# Altium PCB Mega2560_Custom.PcbDoc (part 5 of 6)
Units mil, origin at the board's own origin, x right, y up, seen from the top; angles counter-clockwise.
Board outline 4742.41 x 2889.95 mil, 2 copper layers (Top Layer, Bottom Layer), stack 57 mil thick; 215 components, 134 nets, 793 pads, 779 vias.
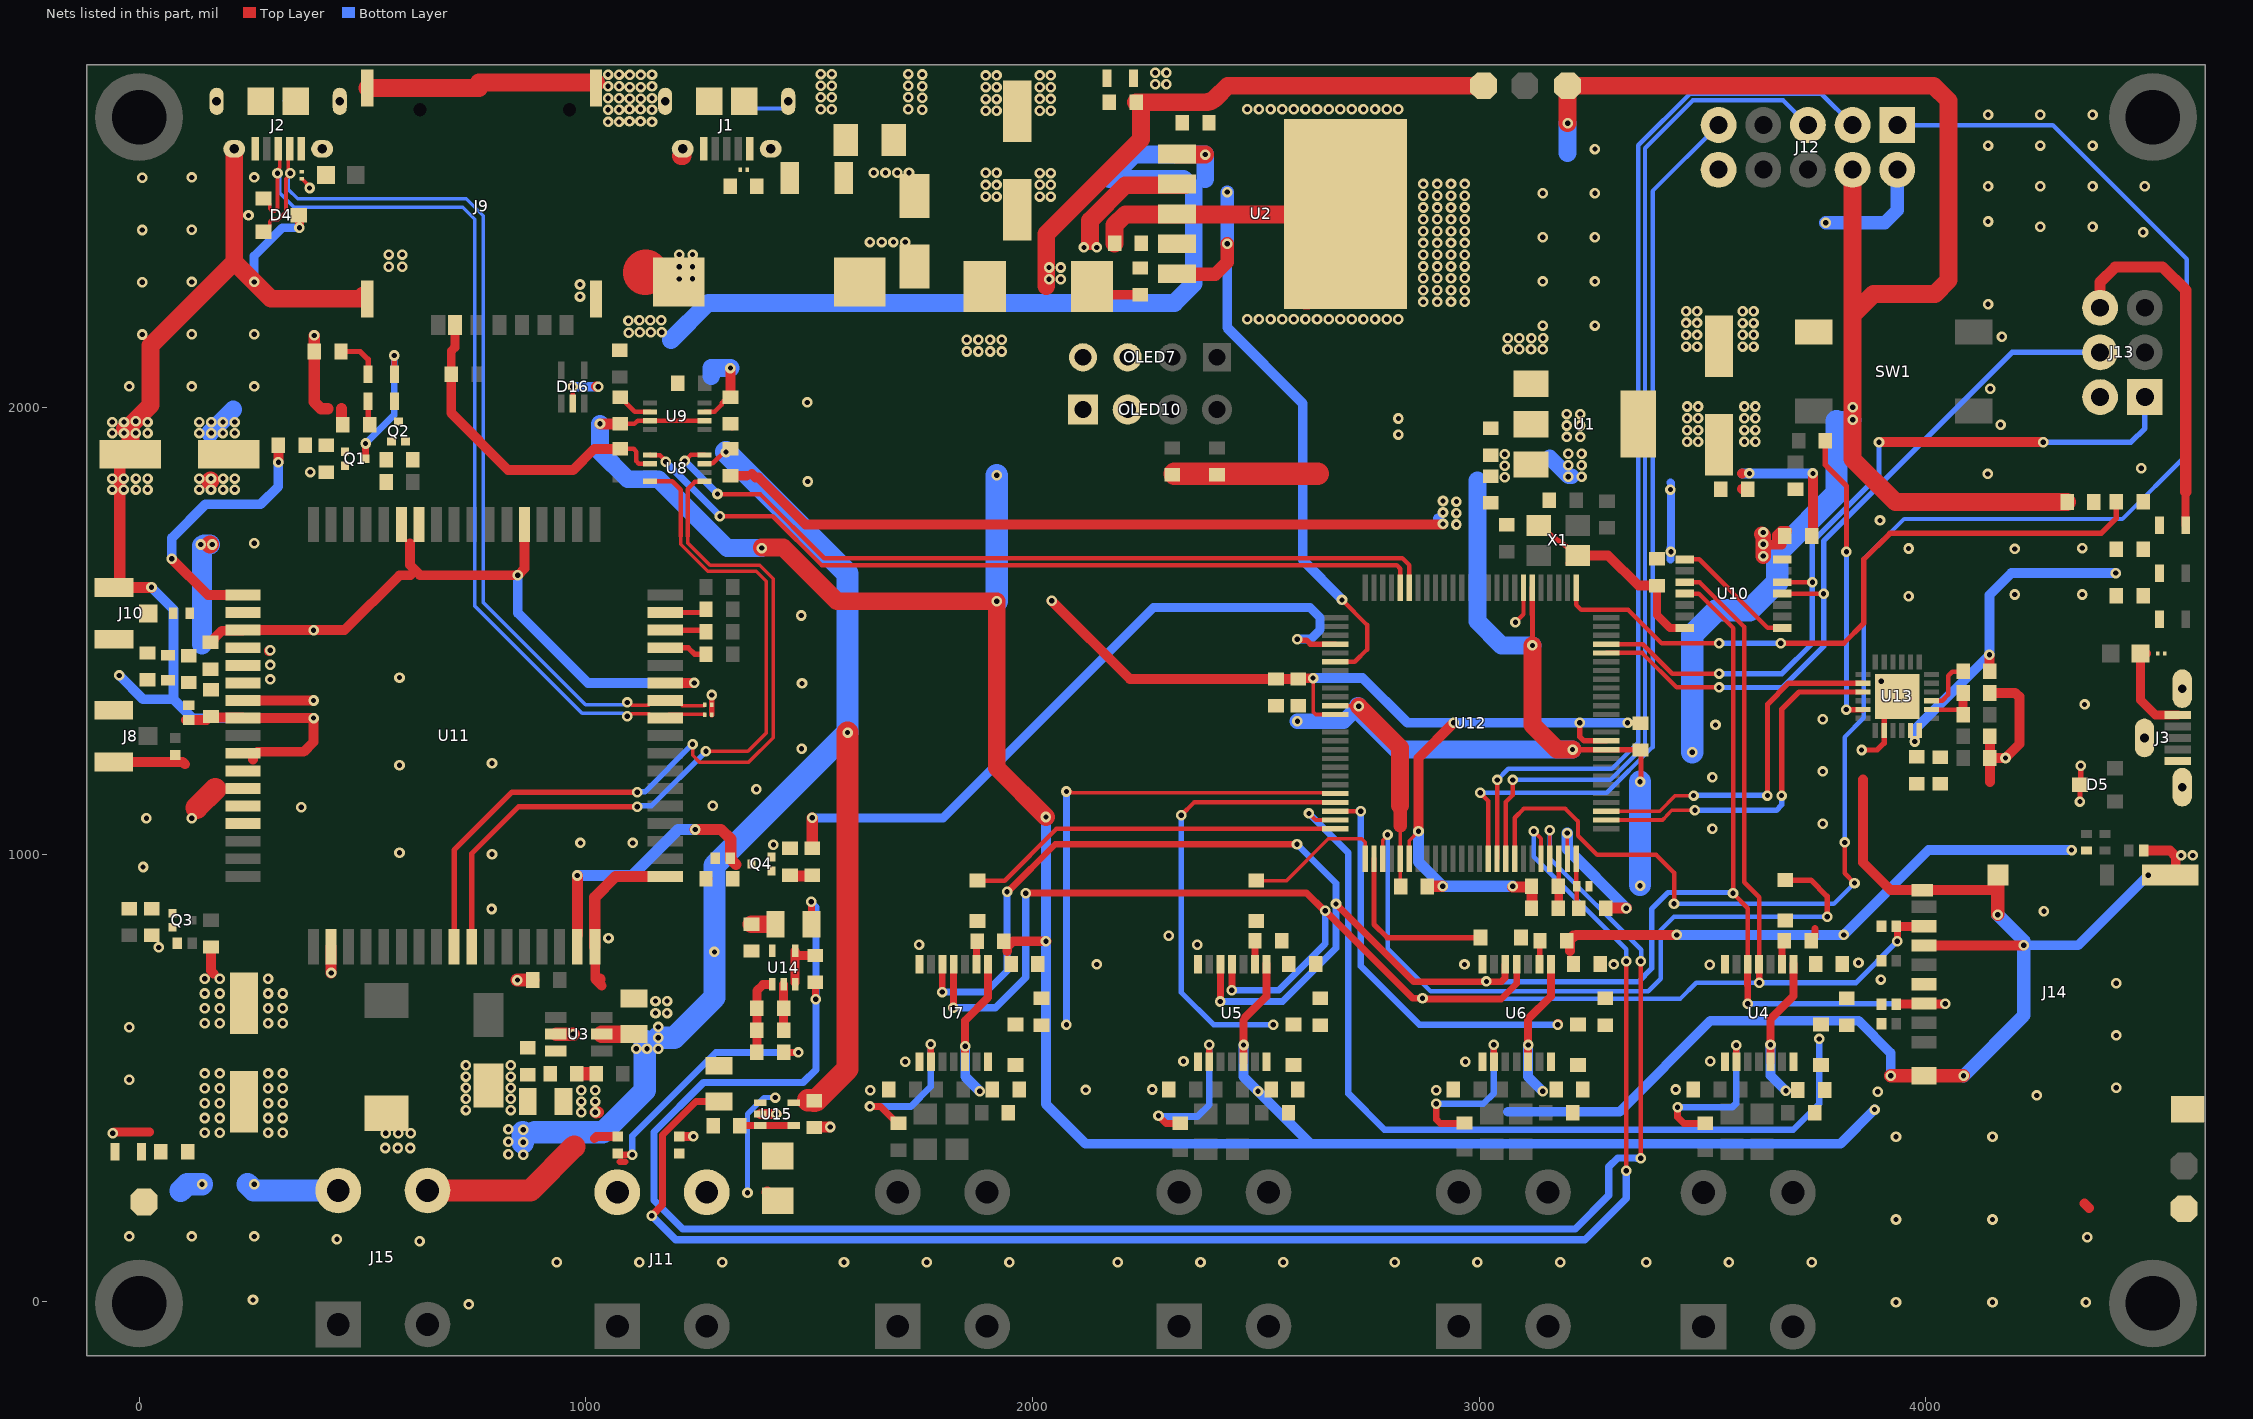
[diagram p2: the nets of this part, all layers, seen from the top]

## Via types
v1: diameter 23.62, hole 11.81, Top Layer to Bottom Layer, 779 vias

## Nets (pads, with @x,y where several pads share a name; then routed paths per layer and width w, separated by ;. In a path a pad name is that pad's centre, name@x,y a point inside that pad or via, vN(x,y) a via of type N, cw(c..) or ccw(c..) an arc to the next point about the centre after c; other vN are vias at no path point) (continued)
GND: (continued)
  Top Layer w22: J8.3@-43.53,1206.88 97.89,1206.88 102.82,1201.95 ; D21.2@105,1301 105.17,1301.17 150.67,1301.17 158.5,1309 C37.2@161,1309 163.44,1306.56 231.62,1306.56 U11.59@232.82,1305.36 v1(390.56,1305.36) 390.56,1251.69 368.82,1229.95 264.82,1229.95 254.82,1219.95 254.82,1212.95 ; C38.2@160,1475 162.5,1475 166.5,1479 166.5,1482.08 185.43,1501 231.62,1501 U11.54@232.82,1502.21 v1(390.56,1502.21) 460.21,1502.21 582.95,1624.95 606.82,1624.95 607.82,1625.95 ; C41.1@161,793 161,740 167,734 ; U11.58@232.82,1344.73 v1(390.56,1344.73) ; 606.82,1696.45 606.82,1647.95 628.82,1625.95 ; 628.82,1624.95 v1(847.82,1624.95) 862.74,1639.87 U11.39@862.74,1738.43 ; C34.1@698.82,2074.95 698.82,1987.95 825.77,1861 971.87,1861 1018.82,1907.95 C29.2@1076.82,1907.95 ; U11.17@1020.22,793.55 1021.01,792.76 1021.01,721.18 1035.82,706.37 ; v1@1022.88,2047.7 v1@1023.19,2047.39 ; U11.29@1177.7,1384.1 v1(1242.67,1384.1) ; C40.1@1269,942 C40.1@1272.88,945.88 ; C54.2@1323.82,1847.95 1359.82,1847.95 ; C33.2@1323.82,1963.95 C33.2@1327.82,1959.95 ; 1372.05,1852 1380.05,1844 1387,1844 1492,1739 v1@2919,1739 ; U15.2@1390.6,419 v1(1426.6,419) ; v1(2042.82,1567.95) 2217.82,1392.95 C61.1@2545,1392.95 C45.2@2595,1392.95 ; C45.2@2598,1390 C45.2@2595,1392.95 C45.2@2595,1392.95 ; v1(2628,1395) 2627.69,1394.69 2596.74,1394.69 C45.2@2595,1392.95 ; v1(2864,1052) 2864,1216 v1(2943,1295) ; X1.4@3220.13,1669.48 3288.52,1669.48 3356.17,1601.83 C30.2@3397.94,1601.83 ; C7.1@3587.82,1817.95 C7.1@3588.51,1818.64 ; 3588.51,1852.64 3588.82,1852.95 ; C31.2@3744,1713 3747,1716 v1@3747,1852.2 ; 3858.82,1167.95 3858.82,982.18 3920.7,920.3 J14.SW-B@3991.58,920.3 4160.87,920.3 4164.48,920.3 ; J14.6@3995.52,796.28 4217.84,796.28 4218.56,797 v1(4219,797) ; 4143,1162 C50.2@4143,1216 ; C49.2@4143,1264.5 C50.2@4143,1216 ; R43.2@4143,1361.5 4199.93,1361.5 4207.48,1353.95 4209.45,1353.95 4209.45,1247.45 v1(4178,1216) ; v1@4173,1216 C50.2@4143,1216 ; D29.2@4487.73,1009 4546.11,1009 4559,996.11 4559,966.06 J14.S3@4546.7,953.76 v1(4497.76,953.76)
  Top Layer w25: C36.2@-43.18,1883 -43.18,1598.02 v1(27.89,1598.02) ; J2.MH2@210.28,2566.4 J2.MH2@213.03,2563.65 ; U11.2@429.67,793.55 429.97,793.25 v1@429.97,735.03 ; J9.2@509.79,2250.95 J9.2@509.79,2271 ; R30.2@613,1884 R30.2@614,1885 ; J9.C5@707.13,2185.45 J9.C5@708.81,2187.13 ; U11.17@1020.22,793.55 1020.22,904.35 1066.9,951.03 U11.18@1177.7,951.03 ; v1@1022.5,421.5 v1(1021,423) v1@1028,423 ; 1029.32,718.45 1031.82,720.95 ; Cx2.2@1511,389 1512,390 v1(1547,390) ; C46.2@2884,928.5 2884.5,929 v1(2918,929) ; v1@3075,927 3115.5,927 C48.2@3118,924.5 ; C62.2@3118,875 C48.2@3118,924.5 ; C48.2@3118,929 C48.2@3118,924.5 ; C60.2@3283,880 v1(3329,880) ; J13.6@4389.82,2223.95 4389.82,2280.95 4423.82,2314.95 4529.82,2314.95 4581.53,2263.24 4581.53,1812
  Top Layer w30: v1(847,719) C35.1@881.48,719 ; U3.2@933.43,598 v1(972,598) ; R5.1@980,509 R3.1@1023,509 ; v1(3921,505) 3921.06,504.94 J14.S1@3995.52,504.94 v1@4083.22,504.94 ; v1@4160.87,866.06 4160.87,920.3 J14.S2@4160.87,953.76
  Top Layer w40: v1@-32,1953 -26.92,1953 26,2005.92 26,2139.43 213.03,2326.46 ; C36.2@-19.24,1896 -19.24,1953 ; C36.2@17.82,1889.82 C36.2@19.82,1887.82 ; J2.MH2@213.03,2563.65 213.03,2326.46 ; J9.2@501.91,2250.95 494.96,2244 295.49,2244 v1(257.77,2281.72) 213.03,2326.46 ; J9.3@511.07,2716.16 761.32,2716.16 ; 761.32,2728.45 J9.4@1022.88,2728.45 ; J1.MH2@1212.74,2563.65 J1.MH2@1217.03,2563.65 ; C56.2@1371,844 Cx4.1@1424,844 ; C4.2@1965.82,2664.18 C4.2@1967.82,2666.18 ; R2.1@2183.82,2367.95 2183.82,2408.95 2207.82,2432.95 U2.6@2700.82,2432.95
  Top Layer w50: 129,1104.63 170.32,1145.95 ; J15.4@645.82,247.95 875.82,247.95 974,346.13
  Top Layer w100: U2.6@2613.22,2270.35 2700.82,2357.95 U2.6@2700.82,2432.95
  Bottom Layer w8: 325,2687.75 333.25,2696 ; J2.MH3@439.2,2696 J2.MH3@449.25,2685.95 ; 1366.63,2663.76 1372.82,2669.95 J1.MH3@1453.25,2669.95
  Bottom Layer w16: J3.SH1@4573.67,1356.92 J3.SH1@4573.67,1371.18
  Bottom Layer w20: v1(257.77,2281.72) 257.77,2339.77 321,2403 v1(359,2403)
  Bottom Layer w22: v1(-44.18,1400.95) 9.13,1347.64 77.36,1347.64 ; v1(27.89,1598.02) 77.36,1548.56 77.36,1347.64 ; v1(390.56,1305.36) 390.15,1304.95 120.05,1304.95 77.36,1347.64 ; v1@847.82,1625.51 v1(847.82,1624.95) 847.82,1540.95 1004.67,1384.1 v1(1242.67,1384.1) ; v1(971,2046.95) v1(1027.88,2046.95) ; v1(2628,1395) 2739,1395 2839,1295 v1(2943,1295) ; 2907,1752 2918.82,1740.18 v1(2918.82,1739.95) ; v1@2944.82,1294.95 v1(3224.82,1294.95) v1(3331.95,1294.95) ; 3064,424 3314,424 3518,628 3849,628 3921,556 v1(3921,505) v1@3921,504.94 ; 3588.82,1852.95 v1(3604.82,1852.95) v1(3747,1852.95) ; v1(4219,797) 4341,797 4497.23,953.23 4497.78,953.23 v1@4498,953.01
  Bottom Layer w25: v1(2864,1052) 2864,983 v1(2918,929) v1(3075,929) ; v1(3197,1048) 3197,1012 v1(3329,880)
  Bottom Layer w30: v1(3775.82,2413.95) 3907.82,2413.95 3935.82,2441.95 J12.2@3935.82,2532.95 ; v1(4084.21,504.94) 4219,639.73 v1(4219,797) 4219,806.94 v1(4160.87,865.07)
  other v1: 738.05,-7.23 3932.95,-2.23 4148.95,-2.23 4358,-2.23 255,3 935,87 1120,87 1305.23,87 1578,87 1763,87 1948.23,87 2191,87 2376,87 2561.23,87 2811,87 2996,87 3181.23,87 3374,87 3559,87 3744.23,87 628,134 443,139 4360.77,143.05 -22.23,145.05 117.77,145.05 257.77,145.05 3932.95,183 4148.95,183 3932.95,368 4148.95,368 990,423 990,447 1021,447 4248.05,460.77 3892,469 990,472 1021,472 1637,472 2904,472 2119,473 2268,474 3440,474 4426,478 -22.23,496.05 1715,536 2969,536 2338,537 3517,537 4426,595 -22.23,613.05 147.35,622.42 180.35,622.42 288.82,622.42 321.35,622.42 1156,645 1182,645 147.35,655.67 180.35,655.67 288.82,655.67 321.35,655.67 1156,672 1182,672 147.35,688.92 180.35,688.92 288.82,688.92 321.35,688.92 4426,712 3899.22,720.1 147.35,722.17 180.35,722.17 288.82,722.17 430,735 3516,753 2144,754 2967,754 3301,754 3849,758 44,792 1746,798 2369,798 1050.82,812.95 2305,818 4264,873 789,878 9,972 4571,998 4597,998 790.02,1000.88 583,1004 1420,1022 988,1026 1105,1026 3522,1057.81 3769,1069 16.58,1081.42 117.77,1081.05 363,1106 1284,1109 1382,1146 3522,1173 3769,1186 583,1200 790.02,1204 1483,1237 3528.81,1290 3769,1303 4355,1336 1484,1383 3900,1388 583,1396 1482,1535 3961,1578 4199,1582 4350,1582 4199,1684 3961,1685 4350,1686 257.77,1696.72 2949,1738.67 3897.05,1747.77 2949,1764.33 2918.82,1765.62 2949,1790 2918.82,1791.28 -60,1817 -34,1817 -7,1817 19,1817 1497,1835 -60,1841.6 -34,1841.6 -7,1841.6 19,1841.6 4138,1852 383,1856 4482.05,1864.77 3593.58,1923.82 3618.18,1923.82 -60,1943.4 -33.67,1943.4 -7.33,1943.4 19,1943.4 3593.58,1950.15 3618.18,1950.15 4167,1962 -60,1968 -33.67,1968 19,1968 -7.33,1969.73 3593.58,1976.48 3618.18,1976.48 3593.58,2002.82 3618.18,2002.82 1496,2012 4143.63,2042.37 -22.23,2047.72 117.77,2047.72 257.77,2047.72 1853,2126 1879,2126 1905,2126 1931,2126 3063.18,2131.18 3089.52,2131.18 3115.85,2131.18 3142.18,2131.18 3463,2137 3487.6,2137 3589.4,2137 3614,2137 1853,2152 1879,2152 1905,2152 1931,2152 3063.82,2155.82 3089.82,2155.82 3116.82,2155.82 3142.82,2155.82 4170,2159 3463,2163 3487.6,2163 3589.4,2163.33 3614,2163.33 7,2164 117.77,2164.72 257.77,2164.72 3142,2184 3259,2184 3463,2190 3487.6,2190 3589.4,2189.67 3614,2189.67 2480.82,2197.95 2506.82,2197.95 2532.82,2197.95 2558.82,2197.95 2584.82,2197.95 2610.82,2197.95 2636.82,2197.95 2662.82,2197.95 2688.82,2197.95 2714.82,2197.95 2740.82,2197.95 2766.82,2197.95 2792.82,2197.95 2818.82,2197.95 3463,2216 3487.6,2216 3589.4,2216 3614,2216 4139,2232 2874.82,2236.95 2905.82,2236.95 2936.82,2236.95 2967.82,2236.95 987,2248.95 2874.82,2263.37 2905.82,2263.37 2936.82,2263.37 2967.82,2263.37 987,2276 7,2281 117.77,2281.72 3142,2282.8 3259,2282.8 2874.82,2289.78 2905.82,2289.78 2936.82,2289.78 2967.82,2289.78 2874.82,2316.2 2905.82,2316.2 2936.82,2316.2 2967.82,2316.2 2874.82,2342.62 2905.82,2342.62 2936.82,2342.62 2967.82,2342.62 2874.82,2369.04 2905.82,2369.04 2936.82,2369.04 2967.82,2369.04 3142,2381.6 3259,2381.6 4486,2393 2874.82,2395.46 2905.82,2395.46 2936.82,2395.46 2967.82,2395.46 7,2398 117.77,2398.72 4256,2405 4373,2405 4139,2417 2874.82,2421.88 2905.82,2421.88 2936.82,2421.88 2967.82,2421.88 245.03,2430.6 2874.82,2448.29 2905.82,2448.29 2936.82,2448.29 2967.82,2448.29 2874.82,2474.71 2905.82,2474.71 2936.82,2474.71 2967.82,2474.71 3142,2480.4 3259,2480.4 4139,2496 4256,2496 4373,2496 4490,2496 2874.82,2501.13 2905.82,2501.13 2936.82,2501.13 2967.82,2501.13 7,2515 117.77,2515.72 257.77,2515.72 1644.53,2526.05 1670.87,2526.05 1697.2,2526.05 1723.53,2526.05 3259,2579.2 4139,2587 4256,2587 4373,2587 1049.82,2639.95 1074.42,2639.95 1148.22,2639.95 1097.82,2640.95 1122.42,2640.95 4139,2656 4256,2656 4373,2656 1895,2665 1919.6,2665 2016.4,2665 2041,2665 1049.82,2666.95 1074.42,2666.95 1148.22,2666.95 1753,2667 1097.82,2667.95 1122.42,2667.95 1525.82,2667.95 1550.42,2667.95 1722,2668 2480.82,2667.95 2506.82,2667.95 2532.82,2667.95 2558.82,2667.95 2584.82,2667.95 2610.82,2667.95 2636.82,2667.95 2662.82,2667.95 2688.82,2667.95 2714.82,2667.95 2740.82,2667.95 2766.82,2667.95 2792.82,2667.95 2818.82,2667.95 1895,2691 1919.6,2691 2016.4,2691.33 2041,2691.33 1098.4,2692 1123,2692 1049.82,2692.95 1074.42,2692.95 1148.22,2692.95 1753,2694 1525.82,2694.95 1550.42,2694.95 1722,2695 1098.4,2718 1123,2718 1895,2718 1919.6,2718 2016.4,2717.67 2041,2717.67 1049.82,2719.95 1074.42,2719.95 1148.22,2719.95 1753,2720 1525.82,2720.95 1550.42,2720.95 1722,2721 2274.82,2723.95 2299.82,2723.95 1895,2744 1919.6,2744 2016.4,2744 2041,2744 1098.4,2745 1123,2745 1049.82,2745.95 1074.42,2745.95 1148.22,2745.95 1753,2746 1525.82,2746.95 1550.42,2746.95 1722,2747 2274.82,2749.95 2299.82,2749.95
GNSS_ANT: C39.2 J10.1 R53.2
GSM_FB: R1.2 R2.2 U2.4
GSM_PWR: C8.1 C36.1 C37.1 C38.1 D21.1 L2.2 P4.1 R1.1 R7.2 R20.2 R25.2 R26.2 U11.55 U11.56 U11.57 | length 1897.6
  Top Layer w22: v1@290.82,1454.95 v1@290.82,1456.95 ; C8.1@2159.82,2252.95 R1.1@2240.82,2252.95
  Top Layer w25: v1(392,2162) R25.2@392,2126 392,2013.5 407.64,1997.86 423.14,1997.86 ; 453.5,1998.5 453.5,1961.5 R26.2@456,1959
  Top Layer w40: v1@158.82,1694.18 v1@159,1694 ; v1@159,1836 v1@160,1837 ; C36.1@212.82,1891.82 C36.1@214.82,1889.82 ; 2030.82,2272.95 2030.82,2388.82 2243,2601 2243,2661.71 ; R7.2@2232,2684 2386.42,2684 ccw(c2386.34,2716.97) 2409.63,2693.63 2436.95,2720.95 P4.1@3009.82,2720.95
  Top Layer w100: 1133.26,2302.95 1134.26,2303.95
  Bottom Layer w40: v1@158.82,1943.95 210.87,1996
  Bottom Layer w45: 141.27,1470.73 v1@141.27,1691.23 ; v1@141.27,1689.5 145.77,1694 v1@159,1694
  other v1: 293.82,1391.95 293.82,1424.45 293.82,1456.95 138,1694 164,1694 135,1817 161,1817 188,1817 214,1817 135,1841.6 161,1841.6 188,1841.6 214,1841.6 135,1943.4 161.33,1943.4 187.67,1943.4 214,1943.4 135,1968 161.33,1968 187.67,1968 214,1968 1209.18,2288.32 2037,2288 2063,2288 1239,2288.95 2037,2314 2063,2314 559.18,2316 589,2316 1209.18,2315.63 1239,2315.95 559.18,2343.05 589,2343.05 1209.18,2342.95 1239,2342.95
GSM_PWR_EN: R49.1 U2.5 U12.56 | length 1402.4
  Top Layer w10: U12.56@2677.67,1431.59 2721.59,1431.59 2748.82,1458.82 2748.82,1513.95 v1(2692.82,1569.95) v1@2692.82,1569.18
  Top Layer w30: U2.5@2323.07,2299.09 2408.96,2299.09 2435.82,2325.95 v1(2435.82,2366.95)
  Bottom Layer w22: v1(2435.82,2366.95) 2435.82,2179.18 2605,2010 2605,1658.82 2692.01,1571.81 2692.01,1571.2 2692.51,1570.7 v1@2692.82,1570.7 ; v1(2435.82,2482.95) 2435.82,2483.82 v1@2436,2484
  Bottom Layer w30: v1(2435.82,2366.95) v1(2435.82,2482.95)
GSM_RESET: R33.2 U12.54 | length 1587.2
  Top Layer w12: v1(2592.82,1481.95) 2595.05,1479.72 2613.05,1479.72 2621.81,1470.96 U12.54@2677.67,1470.96
  Top Layer w25: R33.2@1507,1014 v1(1507,1082)
  Bottom Layer w20: v1@1506,1081 v1(1507,1082) 1799.91,1082 2270.91,1553 2621,1553 2644,1530 2644,1503.22 2622.73,1481.95 v1(2592.82,1481.95)
GSM_RX: U8.4 U11.10 | length 1745.7
  Top Layer w8: 1212.39,1712 1212.39,1694.61 1273.02,1633.98 1381.58,1633.98 1404,1611.56 1404,1272 1363,1231 v1(1269,1231)
  Top Layer w10: U8.4@1143.8,1835.42 1193.35,1835.42 1212.39,1816.38 1212.39,1712
  Top Layer w12: U11.10@744.63,793.55 744.63,1001.76 849.82,1106.95 v1(1115.45,1106.95) v1@1117.82,1106.95
  Bottom Layer w12: v1(1115.45,1106.95) 1117.68,1109.17 1147.17,1109.17 v1(1269,1231)
GSM_TX: U8.5 U11.9 | length 1829.4
  Top Layer w8: 1228,1712 1228,1697.38 1278.18,1647.21 1389.5,1647.21 1419.61,1617.09 1419.61,1261.71 1364.29,1206.39 1254.61,1206.39 1239.11,1221.89 v1(1239.11,1246.98)
  Top Layer w10: 1228,1712 1228,1818.13 1244.39,1834.52 1264.94,1834.52 U8.5@1265.85,1835.42
  Top Layer w12: U11.9@705.26,793.55 705.26,1010.07 834.67,1139.48 v1(1115.45,1139.48)
  Bottom Layer w12: v1(1115.45,1139.48) 1116.11,1140.13 1132.27,1140.13 v1(1239.11,1246.98)
GSM_USB.GSM_USB_D_N: D4.2 D17.1 J2.2 U11.28 | length 2186.2
  Top Layer w8: D4.2@278.63,2393.6 280.6,2393.6 292.74,2405.74 292.74,2416.81 297.43,2421.5 311.92,2421.5 328.94,2438.51 328.94,2512.5 334.89,2518.46 334.89,2519.02 333.74,2520.18 v1(338.56,2525) ; v1@333.55,2520.37 331.71,2522.21 331.71,2528.83 333.55,2530.67 333.55,2537.29 333.75,2537.5 333.75,2576.35 J2.2@337.04,2579.65 ; v1@1102.86,1334.54 1140.35,1334.54 1150.54,1344.73 U11.28@1177.7,1344.73 1204.87,1344.73 1216.17,1333.43 1264.68,1333.43 D17.1@1266.25,1335
  Bottom Layer w8: v1(338.56,2525) ccw(c346.55,2517.01) 335.25,2517.01 333.75,2515.51 333.75,2488.81 354.9,2467.66 732.71,2467.66 770.38,2429.99 770.38,1564.11 999.49,1335 1083.24,1335 1088.6,1340.35 v1(1092.82,1340.35)
GSM_USB.GSM_USB_D_P: D4.1 D18.1 J2.3 U11.27 | length 2176.4
  Top Layer w8: D4.1@278.63,2468.4 280.6,2468.4 292.74,2456.26 292.74,2445.19 297.43,2440.5 304.05,2440.5 309.94,2446.38 v1(309.94,2525) 312.93,2527.99 312.93,2535.68 314.75,2537.5 314.75,2576.35 J2.3@311.45,2579.65 ; v1@1102.86,1315.54 1140.35,1315.54 1150.54,1305.36 U11.27@1177.7,1305.36 1185.91,1313.56 1216.9,1313.56 1217.76,1314.43 1264.04,1314.43 1265.46,1313 D18.1@1266.25,1313
  Bottom Layer w8: v1(309.94,2525) cw(c301.94,2517.01) 313.25,2517.01 314.75,2515.51 314.75,2480.94 347.03,2448.66 724.84,2448.66 751.38,2422.12 751.38,1556.24 991.62,1316 1082.33,1316 1088.6,1309.73 v1(1092.82,1309.73)
JTAG_TCK: J12.1 U12.93 | length 3810.2
  Top Layer w10: U12.93@3079.25,990.65 3079.25,1082.25 3100,1103 3192,1103 3221.04,1073.96 3221.04,1041.87 3263.92,999 3396,999 3436,959 v1@3436,892 ; v1(3818,1027) 3818,958 v1(3840,936) v1@3842,934
  Bottom Layer w10: v1(3436,890) 3794,890 v1(3840,936) ; v1(3818,1027) 3818,1263 3861,1306 3861,1661 3951,1751 4439.82,1751 4583.82,1895 4583.82,2332.95 4283.82,2632.95 J12.1@3935.82,2632.95
JTAG_TDI: J12.9 U12.90 | length 2038.4
  Top Layer w10: v1@3001,1139 v1(3002,1138) 3020.19,1119.81 U12.90@3020.19,990.65
  Bottom Layer w10: v1(3002,1138) 3285.5,1138 3388,1240.5 3388,2485.13 J12.9@3535.82,2632.95
JTAG_TDO: J12.3 U12.91 | length 2419.3
  Top Layer w10: U12.91@3039.88,990.65 3039.88,1165.88 v1@3040,1166
  Bottom Layer w10: v1(3040,1167) 3065,1192 3297.08,1192 3356,1250.92 3356,2587.34 3471.61,2702.95 3765.82,2702.95 J12.3@3835.82,2632.95
JTAG_TMS: J12.5 U12.92 | length 2279.2
  Top Layer w10: U12.92@3059.56,990.65 3059.56,1117.56 3075,1133 v1(3075,1167)
  Bottom Layer w10: v1(3075,1167) 3293.29,1167 3371,1244.71 3371,2581.13 3477.82,2687.95 3680.82,2687.95 J12.5@3735.82,2632.95
MCU_RX: U8.8 U12.45 | length 1817.4
  Top Layer w10: v1(1221.82,1881) 1235.3,1894.48 U8.8@1265.85,1894.48 ; v1(1294.82,1806.95) 1390.05,1806.95 1534,1663 2828,1663 2843.03,1647.97 U12.45@2843.03,1596.95
  Bottom Layer w16: v1(1221.82,1881) v1@1294.42,1808.41
MCU_TX: U8.1 U12.46 | length 1829.2
  Top Layer w10: U8.1@1143.8,1894.48 1144.31,1893.96 1166.15,1893.96 1178.82,1881.3 v1(1178.82,1878.95) ; v1(1300.32,1757.45) 1418.34,1757.45 1527.79,1648 2815,1648 2823.34,1639.66 U12.46@2823.34,1596.95
  Bottom Layer w16: v1(1178.82,1878.95) v1(1300.32,1757.45)
MISO: J13.1 U10.12 U12.22 | length 1773.9
  Top Layer w10: U12.22@3283.97,1470.96 3366.04,1470.96 3432.05,1404.95 v1(3536.82,1404.95) ; U10.12@3678.07,1609.54 v1(3745.82,1609.54)
  Top Layer w22: v1@3895.57,1923.26 v1@4262.82,1923.26
  Bottom Layer w12: v1(3536.82,1404.95) 3677.82,1404.95 3745.82,1472.95 3745.82,1700.86 3894.82,1849.86 v1(3894.82,1922.95) ; v1(4262.82,1922.95) 4458.77,1922.95 4489.82,1954 J13.1@4489.82,2023.95
MISO_3.3V: D28.1 J14.7 U4.11 U5.11 U6.11 U7.11 U10.3 | length 4313.5
  Top Layer w10: U10.3@3459.57,1609.54 3493.23,1609.54 3593.41,1509.36 3593.41,937.59 3626.8,904.2 U4.11@3626.8,754.21
  Top Layer w15: v1(1823,657) 1823.32,657.32 1823.32,754.09 U7.11@1823.64,754.41 ; v1(2446,696) 2446.41,696.41 2446.41,754 U5.11@2446.82,754.41 ; v1(2655,874.38) 2851.38,678 v1(2873,678) 2874.31,676.69 3049.31,676.69 3083.86,711.24 U6.11@3083.86,754.41 ; U4.11@3626.59,754.41 3626.8,754.21 3626.8,713.2 v1(3627,713)
  Top Layer w16: v1(1985,913) 1985.8,913.8 2613.52,913.8 2652.94,874.38 v1(2655,874.38) ; D28.1@3935.03,839.29 3934.73,839 3936,837.73 v1(3936,806) ; J14.7@3995.22,839.29 J14.7@3995.52,839.59
  Top Layer w20: D28.1@3935.03,839.29 J14.7@3995.22,839.29
  Bottom Layer w10: v1(2873,678) 2874.31,676.69 3449.49,676.69 3485.8,713 v1(3627,713)
  Bottom Layer w12: v1(3627,713) 3843,713 v1(3936,806)
  Bottom Layer w15: v1(2446,696) 2551,696 2655,800 v1(2655,874.38)
  Bottom Layer w16: v1(1823,657) 1917,657 1985,725 v1(1985,913)
MOSI: J13.4 U10.11 U12.21 | length 1679.5
  Top Layer w10: U12.21@3283.97,1451.28 3364.51,1451.28 3441.84,1373.95 v1(3536.82,1373.95) ; U10.11@3678.07,1583.95 v1(3770.82,1583.95)
  Bottom Layer w12: v1(3536.82,1373.95) 3678.82,1373.95 3770.82,1465.95 3770.82,1701.82 4192.95,2123.95 J13.4@4389.82,2123.95
MOSI_3.3V: D26.1 J14.3 U4.12 U5.12 U6.12 U7.12 U10.4 | length 4504
  Top Layer w10: U10.4@3459.57,1583.95 3491.82,1583.95 3569,1506.77 3569,914 v1(3568,913) 3601,880 U4.12@3601,754.41
  Top Layer w12: D26.1@3934.73,665 D26.1@3935.41,665.68 ; J14.3@3991.66,665.68 J14.3@3993.92,667.95
  Top Layer w15: v1(1798,692) U7.12@1798.03,754.38 ; v1(1943,916.81) 1944.81,916.81 2051,1023 v1(2592,1023) ; v1(2420,671) 2420.62,671.62 2420.62,753.79 U5.12@2421.23,754.41 ; v1(2679.34,889.45) 2853.78,715 3015.19,715 v1(3016,715.81) ; v1@3016,715 3048.76,715 3057.55,723.79 3057.55,753.69 U6.12@3058.27,754.41 ; v1@3601,672.98 3601,706.62 3600.69,706.93 3600.69,754.1 U4.12@3601,754.41
  Top Layer w20: D26.1@3935.41,665.68 3991.66,665.68 v1@4042.96,665.68
  Top Layer w22: J14.3@3993.92,667.95 J14.3@3995.52,666.36
  Bottom Layer w12: v1(3016,715.81) 3016.81,715 3356,715 3386,745 3386,878 3423,915 3566,915 v1(3568,913) ; v1(3601,665.67) v1(4042.97,665.67)
  Bottom Layer w15: v1(1798,692) 1896,692 1943,739 v1(1943,916.81) ; v1(2420,671) 2560,671 2679.34,790.34 v1(2679.34,889.45) 2679.34,935.66 v1(2592,1023)
NetC39_1: C39.1 U11.53
NetC55_2: C55.2 D1.2 F1.1 J1.1
NetCx1_2: Cx1.2 R51.1 R54.2 U14.1 | length 174.2
  Top Layer w20: R51.1@1382,557 1383,558 R54.2@1383,606.5 Cx1.2@1383,656 1383,695 1397,709 U14.1@1413,709
NetD2_2: D2.2 F2.1 J2.1
NetD3_2: D3.2 F3.1 J3.1 | length 221.3
  Top Layer w20: F3.1@4477,1447 F3.1@4488,1447 ; F3.1@4484,1440 F3.1@4494,1450 ; F3.1@4484,1440.26 4480,1440.26 4480,1346 4513.87,1312.13 J3.1@4563.82,1312.13
NetD7_1: D7.1 L2.1 U2.2 | length 292
  Top Layer w40: 2129,2372.95 2129,2419.36 2207.64,2498 U2.2@2342,2498
  other v1: 2115,2358.95 2143.82,2358.95 1636,2371 1662.33,2371 1688.67,2371 1715,2371
NetD8_2: D8.2 R8.1 U4.9 | length 52.6
  Top Layer w15: U4.9@3677.77,754.41 R8.1@3677.77,807
NetD9_2: D9.2 R9.1 U5.9 | length 52.6
  Top Layer w15: U5.9@2498,754.41 R9.1@2498,807
NetD10_2: D10.2 U4.7
NetD11_2: D11.2 U5.7
NetD12_2: D12.2 R14.1 U6.9 | length 53
  Top Layer w12: U6.9@3135.04,754.41 3135.52,754.89 3135.52,806.52 R14.1@3136,807
NetD13_2: D13.2 R15.1 U7.9 | length 52.6
  Top Layer w15: U7.9@1874.82,754.41 R15.1@1874.82,807
NetD14_2: D14.2 U6.7
NetD15_2: D15.2 U7.7
NetF1_2: F1.2 FB1.1
NetJ13_2: J13.2 SB1.1
NetL3_1: L3.1 R20.1 | length 2.5
  Top Layer w22: R20.1@105,1445 R20.1@107.5,1445
NetL3_2: L3.2 R53.1
NetLED1_1: LED1.1 R6.1
NetLED2_1: LED2.1 R7.1
NetLED3_1: LED3.1 R25.1 | length 101.4
  Top Layer w12: R25.1@452,2126 495,2126 512.77,2108.23 LED3.1@512.77,2074.95
NetLED3_2: LED3.2 Q1.3 | length 299.7
  Top Layer w10: v1(571,2117) v1@571.41,2116.59 ; LED3.2@571.41,2075.36 LED3.2@571.82,2074.95
  Top Layer w12: LED3.2@571.41,2075.36 v1@571.41,2116.59
  Top Layer w15: Q1.3@506.82,1886 v1@506.82,1919.82
  Bottom Layer w15: v1(507,1920) 571,1984 v1(571,2117)
NetLED4_1: LED4.1 R26.1 | length 55.9
  Top Layer w12: R26.1@512.77,1959 LED4.1@512.77,2014.95
NetLED4_2: LED4.2 Q2.3 | length 4.1
  Top Layer w10: LED4.2@567.82,2014.95 LED4.2@568.82,2013.95 ; LED4.2@571.82,2014.95 LED4.2@573.74,2013.04
NetLED6_1: LED6.1 R41.1
NetLED8_1: LED8.1 R45.1
NetLED9_1: LED9.1 R46.1
NETLIGHT: R27.2 U11.52 | length 618.4
  Top Layer w22: v1(73,1662) 154.05,1580.95 U11.52@232.82,1580.95 ; v1(312,1878) R27.2@312,1916
  Bottom Layer w22: v1(73,1662) 73.31,1662.31 73.31,1708.31 149,1784 272,1784 311.69,1823.69 311.69,1877.69 v1(312,1878)
NetQ1_1: Q1.1 R27.1 R28.1
NetQ2_1: Q2.1 R29.1 R30.1
NetQ3_1: Q3.1 R31.1 R32.1
NetQ4_1: Q4.1 R33.1 R34.1 | length 50
  Top Layer w25: R34.1@1457,952 R33.1@1507,952
NetR10_1: R10.1 U4.2 | length 391.9
  Top Layer w15: v1(3444,434) 3444,412 3458,398 R10.1@3506,398 ; v1(3575,573) 3575.2,572.8 3575.2,536.11 U4.2@3575.41,535.91
  Bottom Layer w15: v1(3444,434) 3566.21,434 3575,442.79 v1(3575,573)
NetR11_1: R11.1 U5.2 | length 354.4
  Top Layer w15: v1(2282,415) 2299,398 R11.1@2331,398 ; U5.2@2395.64,535.91 v1(2395.64,574.36)
  Bottom Layer w15: v1(2282,415) 2283.65,413.35 2369.35,413.35 2395.64,439.64 v1(2395.64,574.36)
NetR16_1: R16.1 U6.2 | length 388.5
  Top Layer w15: v1(2904,442) 2904,406.79 2912.79,398 R16.1@2968.04,398 ; U6.2@3032.68,535.91 v1(3032.68,574.36)
  Bottom Layer w15: v1(2904,442) 3009,442 3032.68,465.68 v1(3032.68,574.36)
NetR17_1: R17.1 U7.2 | length 368.3
  Top Layer w15: v1(1636,436) 1659.5,436 1697.5,398 R17.1@1700,398 ; v1(1772,575) 1772.23,574.77 1772.23,536.14 U7.2@1772.46,535.91
  Bottom Layer w15: v1(1636,436) 1728,436 1772,480 v1(1772,575)
NetR21_2: R21.2 U11.33 | length 94.4
  Top Layer w10: R21.2@1262.14,1541.58 R21.2@1269.18,1548.62
  Top Layer w12: U11.33@1177.7,1541.58 R21.2@1262.14,1541.58
NetR22_2: R22.2 U11.32 | length 93.1
  Top Layer w10: R22.2@1265.25,1502.21 R22.2@1269.18,1498.28
  Top Layer w12: U11.32@1177.7,1502.21 R22.2@1265.25,1502.21
NetR23_2: R23.2 U11.31 | length 97.6
  Top Layer w12: U11.31@1177.7,1462.84 1229.16,1462.84 1244.05,1447.95 R23.2@1269.18,1447.95
NetR42_1: R42.1 R43.1 U13.8 | length 118.9
  Top Layer w10: U13.8@4012.59,1324.42 4083,1324.42 R42.1@4083,1313
  Top Layer w20: R42.1@4083,1324.42 R43.1@4083,1361.5
NetR44_2: R44.2 U13.9 | length 122.3
  Top Layer w10: U13.9@4012.59,1344.11 4012.76,1344.28 4036.28,1344.28 4050,1358 4050,1400 4058.86,1408.86 4081.86,1408.86 R44.2@4083,1410
NetR55_1: R55.1 U14.3 U14.4 | length 111.3
  Top Layer w20: U14.3@1468.59,713.97 U14.4@1468.59,784.4 ; U14.4@1474,776 1476,774 R55.1@1514,774
NRESET: C40.2 D19.2 Q4.3 U11.16 | length 588.8
  Top Layer w25: U11.16@981.15,820.42 v1@981.15,953 ; v1(1245,1056) 1303,1056 1324.5,1034.5 1324.5,989.5 1336,978
  Bottom Layer w25: v1@981.15,953 1104,953 1207,1056 v1(1245,1056)
  other v1: 981,953
PB7: R41.2 U12.26 | length 1511.5
  Top Layer w10: U12.26@3217.04,1596.95 3217.04,1558.73 3227.82,1547.95 3333.05,1547.95 3408.05,1472.95 v1(3536.82,1472.95)
  Top Layer w12: v1(3674.82,1472.95) 3815.95,1472.95 3861,1518 3861,1661 3919,1719 4392,1719 4426,1753 R41.2@4426,1782
  Bottom Layer w12: v1(3536.82,1472.95) v1(3674.82,1472.95)
PRGM_DTR: C44.1 U13.23 | length 661.6
  Top Layer w12: C44.1@3774.82,1925.95 3774.82,1872.18 3822,1825 v1(3822,1678) ; v1@3818.29,1324.42 v1(3821.82,1324.42) U13.23@3859.05,1324.42
  Bottom Layer w12: v1@3822,1324.6 v1(3822,1678)
PRGM_RX: U12.3 U13.20 | length 813.8
  Top Layer w8: U12.3@3283.97,1096.95 3403.95,1096.95 3438.95,1131.95 v1(3479.82,1131.95)
  Top Layer w12: v1(3645.14,1131.95) 3645.14,1336.14 3692.48,1383.48 U13.20@3859.05,1383.48
  Bottom Layer w12: v1@3479.82,1132.95 3480.32,1132.45 3644.64,1132.45 v1(3645.14,1131.95)
PRGM_TX: U12.2 U13.21 | length 819.4
  Top Layer w8: U12.2@3283.97,1077.26 3410.26,1077.26 3420,1087 ; 3419.5,1087.5 3430.95,1098.95 v1(3482.82,1098.95)
  Top Layer w12: v1(3676.82,1131.95) 3676.82,1324.82 3715.79,1363.79 U13.21@3859.05,1363.79
  Bottom Layer w12: v1(3482.82,1098.95) 3664.95,1098.95 3676.82,1110.82 v1(3676.82,1131.95)